# Altium PCB PCB_HV.PcbDoc
Units mm, origin at the board's own origin, x right, y up, seen from the top; angles counter-clockwise.
Board outline 50.11 x 53.87 mm, 2 copper layers (Top Layer, Bottom Layer), stack 1.27 mm thick; 13 components, 10 nets, 38 pads, 0 vias.
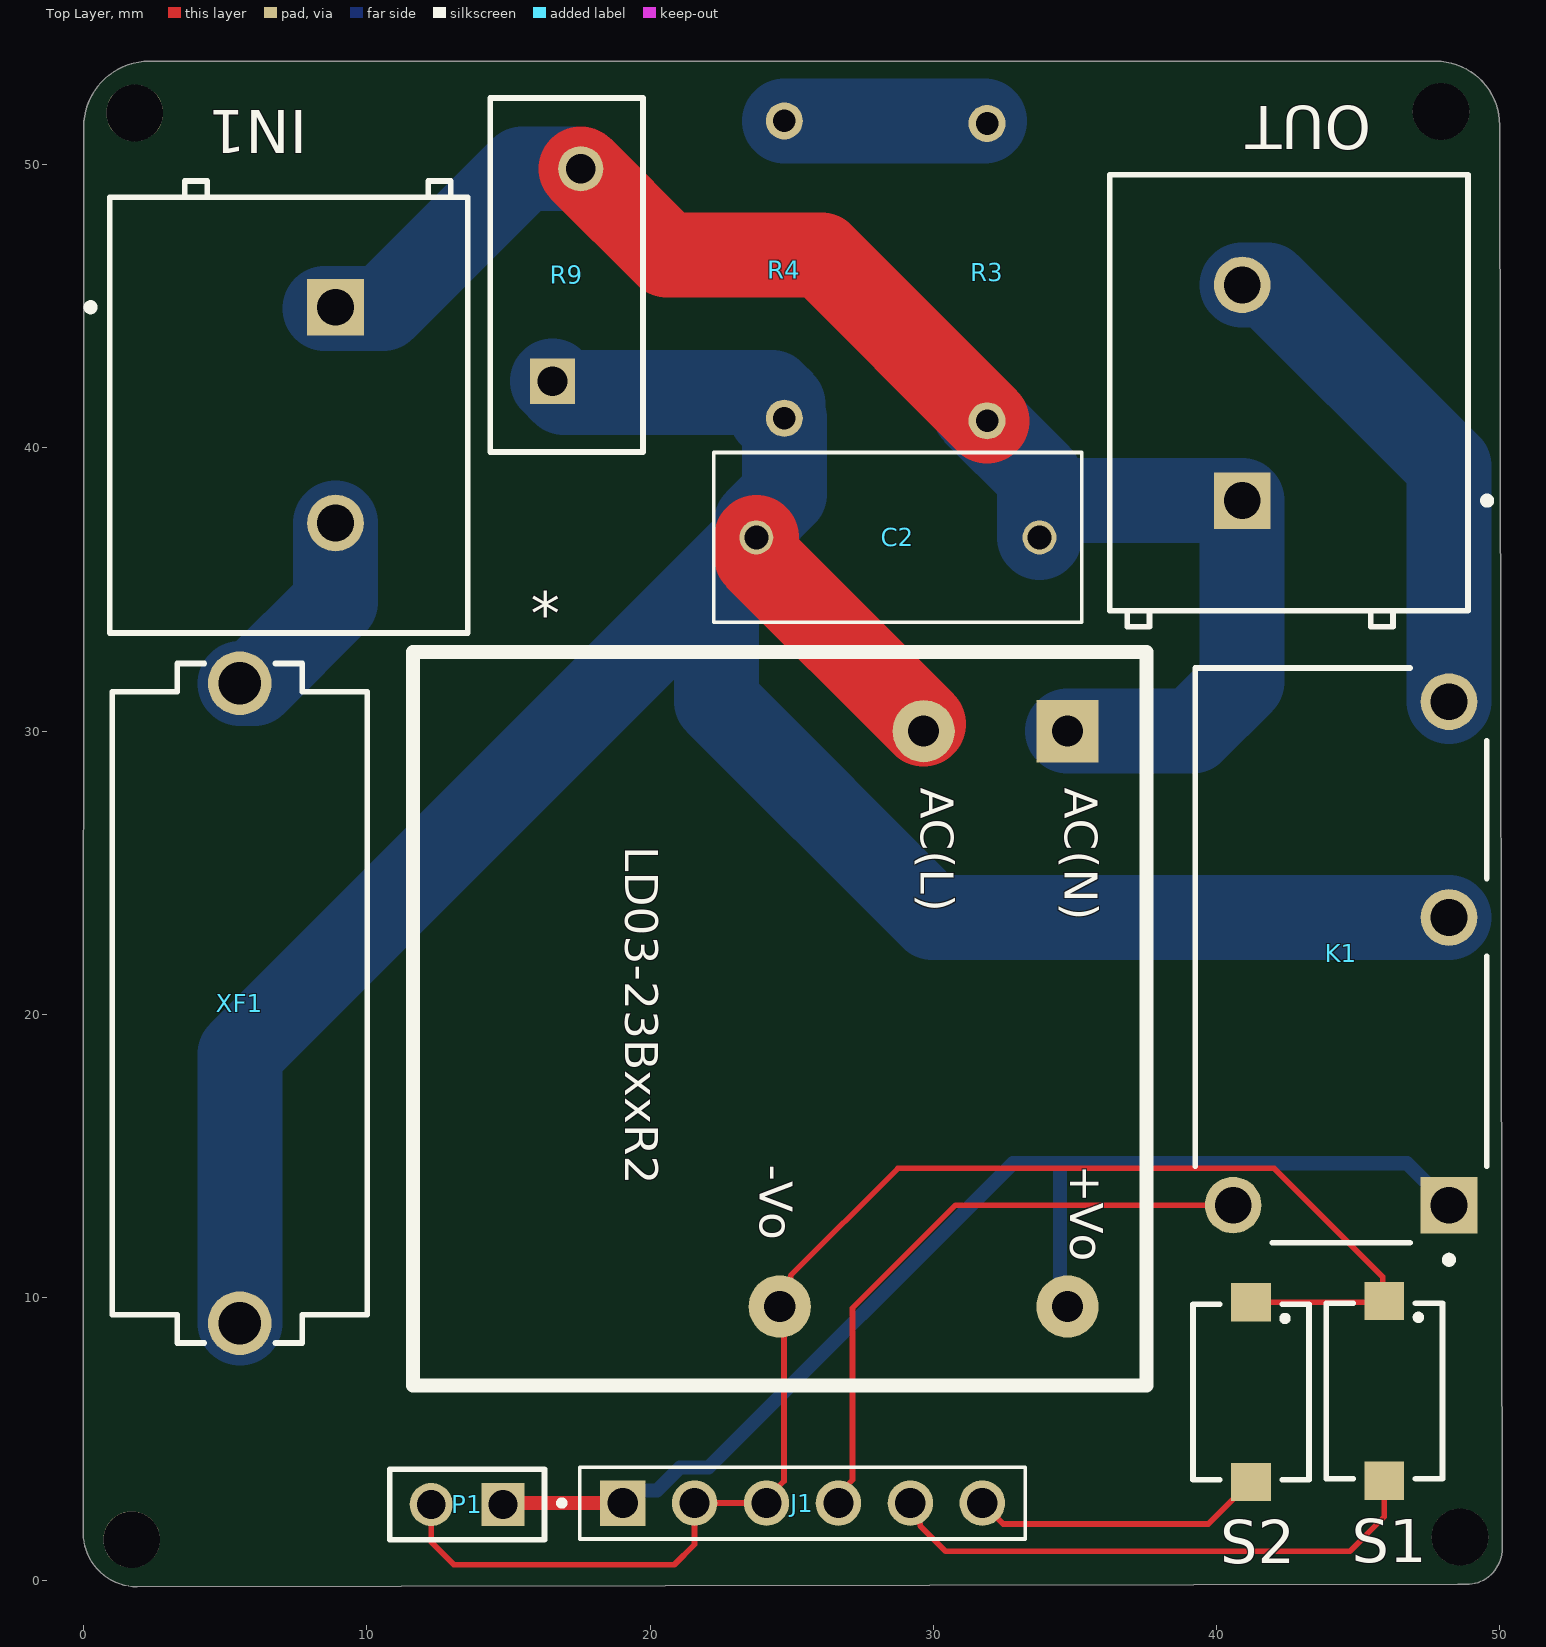
[diagram p0: Top Layer view]
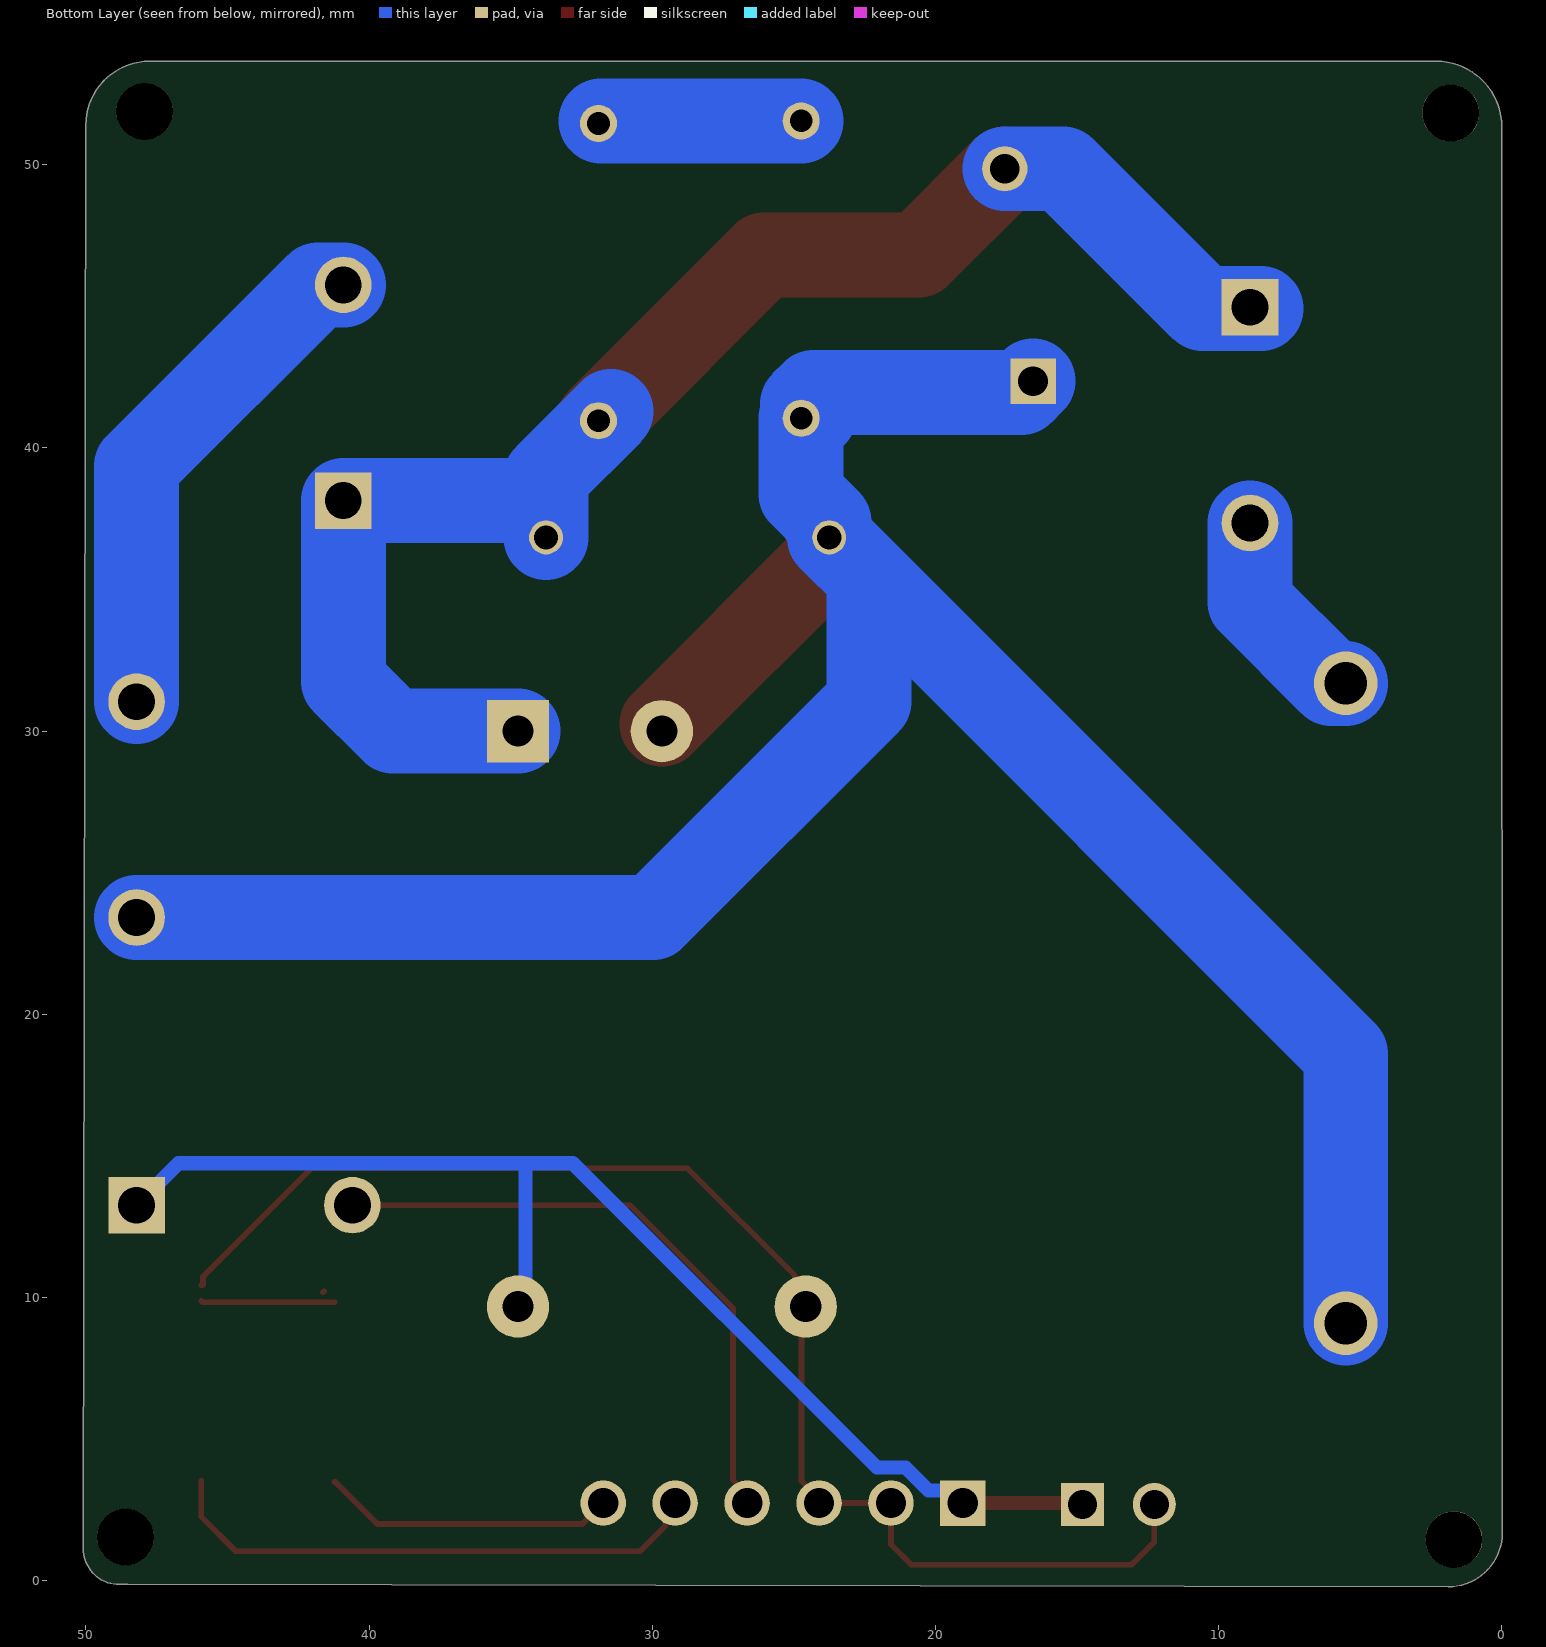
[diagram p1: Bottom Layer view, seen from below]
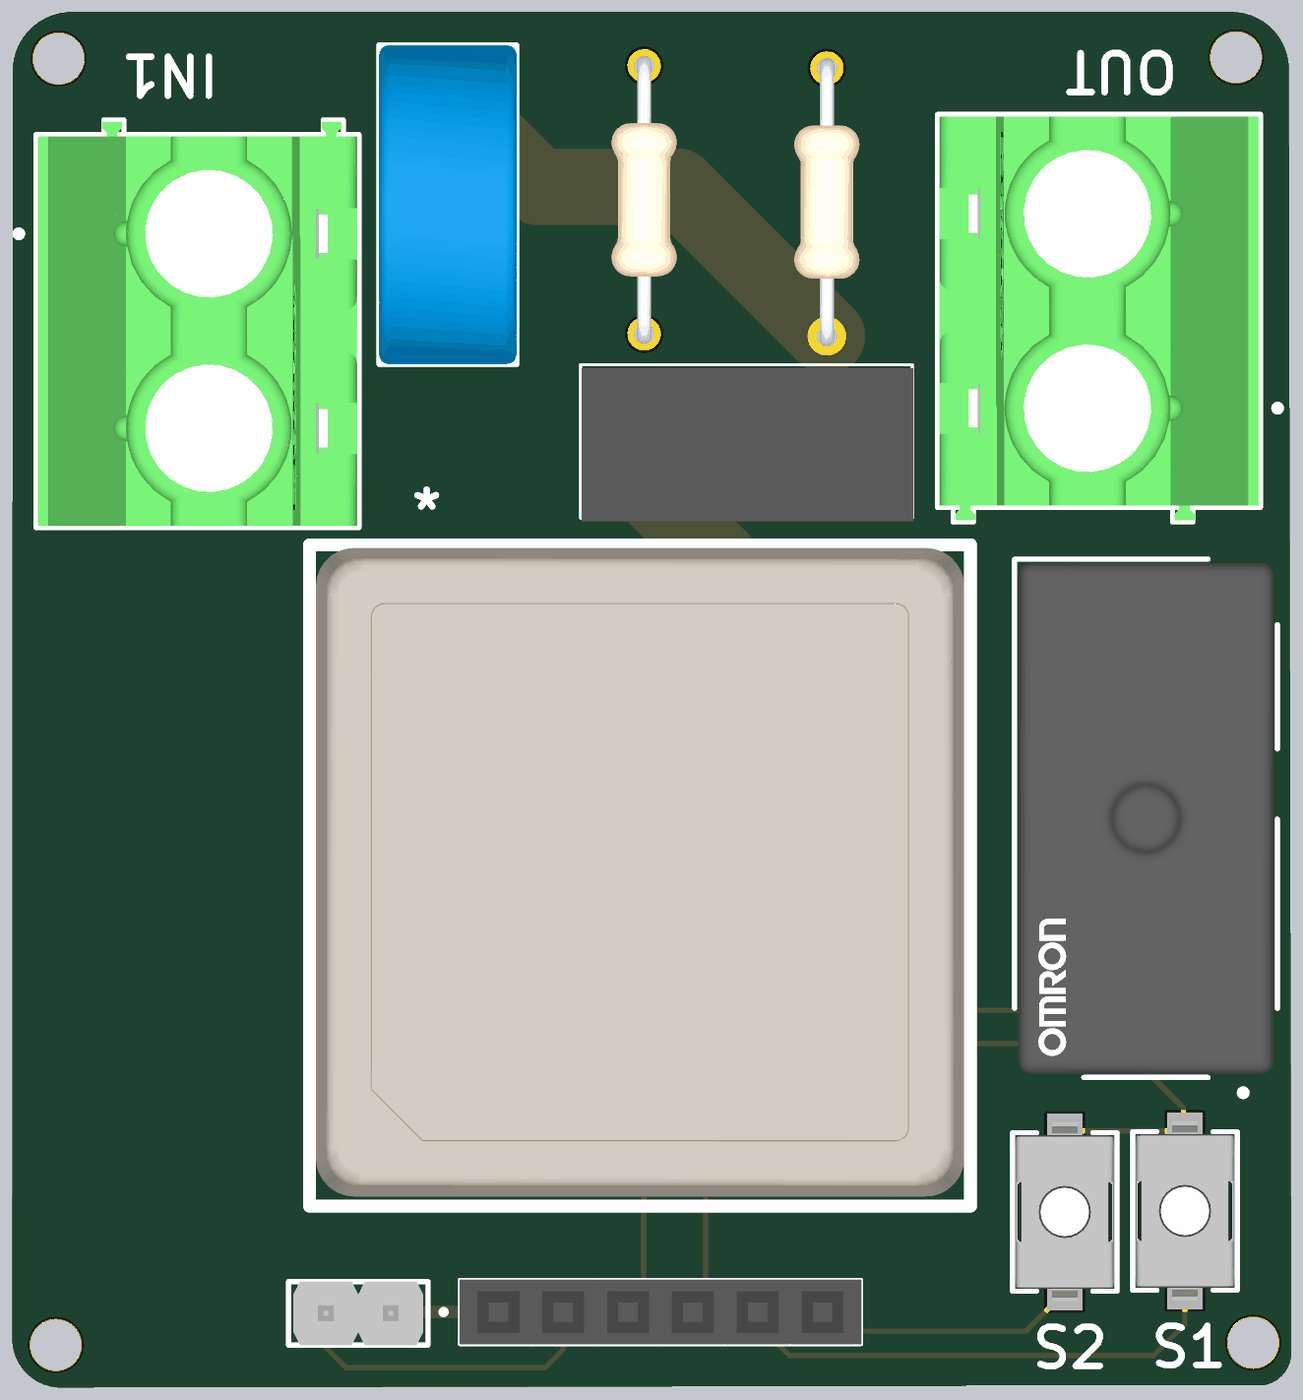
[diagram p2: 3D render of the assembled board from above, using the file's embedded part models]

## Layer stack, top to bottom
Top Solder: solder mask 0.0102, Solder Resist, Dk 3.5
Top Layer: signal copper 0.035
Dielectric 1: dielectric 1.2, FR-4, Dk 4.8
Bottom Layer: signal copper 0.035
Bottom Solder: solder mask 0.0102, Solder Resist, Dk 3.5

## Board outline
1.887,-0.215 cw(c1.887,1.69) -0.018,1.69 0,51.338 cw(c2.318,51.338) 2.318,53.656 47.748,53.656 cw(c47.748,51.405) 49.999,51.405 49.999,51.347 50.093,1.135 cw(c48.823,1.135) 48.823,-0.135 48.516,-0.135

## Design rules (kind name [scope] priority, off if disabled: settings)
Clearance Clearance_HV-HV_exeption [InNet('L_INPUT') vs InNet('N_INPUT')] p1: gap=2.48 ignorepadtopadclearanceinfootprint=FALSE
Clearance Clereance_HV-LV [InNetClass('HV') vs Not InNetClass('HV')] p2: gap=6 ignorepadtopadclearanceinfootprint=FALSE
Clearance Clearance_HV-HV [InNetClass('HV') vs InNetClass('HV')] p3: gap=2.5 ignorepadtopadclearanceinfootprint=FALSE
Clearance [All] p4: gap=0.2 ignorepadtopadclearanceinfootprint=FALSE
PolygonConnect [All] p1: connectstyle=Relief reliefconductorwidth=0.254 reliefentries=4 polygonreliefangle="90 Angle" airgapwidth=0.254
RoutingVias Via_LV [All] p1: holewidth=0.3 width=0.6 viastyle="Through Hole" minholewidth=0.2 minwidth=0.4 maxholewidth=0.3 maxwidth=0.6
SilkToSolderMaskClearance [All] p1: minsilkscreentomaskgap=0.15 clearancetoexposedcopper=TRUE
SolderMaskExpansion [All] p1: expansion=0.102 istentingtop=FALSE
SupplyNets "Schematic Supply Nets_1" [InNet('GND')] p1: voltage=0.000
SupplyNets "Schematic Supply Nets" [InNet('5V')] p2: voltage=0.000
Width Width_HV [InNetClass('HV')] p1: maxlimit=5 minlimit=3 preferedwidth=4
Width Width_LV_POWER [InNet('5V')] p2: maxlimit=0.5 minlimit=0.5 preferedwidth=0.5
Width [All] p3: maxlimit=0.2 minlimit=0.1 preferedwidth=0.15
29 further rules are at their usual default settings.

## Classes and differential pairs
net class HV: L L_INPUT L_OUT N_INPUT NetR3_1
component class POWER: * C2 IN1 J1 K1 OUT P1 R3 R4 S1 S2 XF1

## Components (designator, comment, footprint, x,y, rotation, side; value= is the part's Value field where it differs from the comment)
* "LD03-23BxxR2" LD03-23BxxR2 29.66,19.84 r270 top
C2 "B32921C3104M189" *CAPRR1000W60L1300T600H1200 28.75,36.84 r0 top
IN1 "1868076" FP-1868076-MFG 7.24,41.445 r270 top
J1 "PPTC061LFBN-RC" *SULLINS_PPTC061LFBN-RC 25.38,2.74 r0 top
K1 "G5Q-1A4-DC5" FP-G5Q-1A4-DC5-MFG 44.4,22.08 r90 top
OUT "1868076" FP-1868076-MFG 42.56,41.665 r90 top
P1 "MTLW-102-05-G-S-172" SMTC-MTLW-102-05-X-S-172 14.81,2.69 r180 top
R3 "RES-THT_470k" XTAL_ZTA-6.00MG 31.9,46.21 r270 top
R4 "RES-THT_470k" XTAL_ZTA-6.00MG 24.74,46.3 r90 top
R9 "MOV-10D471K" FP-MOV-10D471K-MFG 17.05,46.11 r90 top value=252pF
S1 "434123025816" 434123025816 45.93,6.7 r270 top
S2 "434123025816" 434123025816 41.22,6.66 r270 top
XF1 "696101000002" 696101000002 1275.51,-1249.61 r270 top

## Footprints (in the part's own frame and the unit in brackets; to place one, negate y for a bottom-side part, rotate by r counter-clockwise, add the part's x,y. Pads: shape width x height; smd on the part's side, far side on the other; paste and mask are expansions set on the pad)
434123025816 [mm]
  rect 1.35x1.4 smd paste+0 mask+0.102: 1(-3.175,0) 2(3.175,0)
  silkscreen extent -3.1,-2.05 3.1,2.05, body extent -3.5,-1.95 3.5,1.95, height 2.5
696101000002 [mm] "FUSEHOLDER BLOCKS - PCB - CLIP COVER - THT"
  round 2.25 hole 1.5: 1(-1281.3,-1270) 2(-1258.7,-1270)
  silkscreen extent -1282,-1274.5 -1258,-1265.5, body extent -1282,-1274.5 -1258,-1265.5, height 13.55
*CAPRR1000W60L1300T600H1200 [mm]
  round 1.2 hole 0.85: 1(-5,0) 2(5,0)
  silkscreen extent -6.5,-3 6.5,3, body extent -6.46,-3.13 6.54,2.87, height 12
*SULLINS_PPTC061LFBN-RC [mm]
  rect 1.605x1.605 hole 1.07: 1(-6.35,0)
  round 1.605 hole 1.07: 2(-3.81,0) 3(-1.27,0) 4(1.27,0) 5(3.81,0) 6(6.35,0)
  silkscreen extent -8.6,-1.27 7.87,1.27, body extent -7.87,-1.27 7.87,1.27, height 8.51
FP-1868076-MFG [mm]
  rect 2x2 hole 1.3 paste-2539.97 mask+0: 1(-3.525,1.65)
  round 2 hole 1.3 paste-2539.97 mask+0: 2(4.095,1.65)
  silkscreen extent -7.98,-7.12 7.98,6.32, body extent -8.08,-6.43 8.08,6.43, height 0.25
FP-G5Q-1A4-DC5-MFG [mm]
  rect 2x2 hole 1.3 paste-2539.97 mask+0: 1(-8.82,-3.81)
  round 2 hole 1.3 paste-2539.97 mask+0: 2(1.34,-3.81) 3(8.96,-3.81) 5(-8.82,3.81)
  silkscreen extent -10.87,-5.15 10.15,5.15, body extent -10.25,-5.25 10.25,5.25, height 0.25
FP-MOV-10D471K-MFG [mm]
  rect 1.6x1.6 hole 1.05 paste-2539.97 mask+0: 1(-3.75,0.5)
  round 1.6 hole 1.05 paste-2539.97 mask+0: 2(3.75,-0.5)
  silkscreen extent -6.25,-2.7 6.25,2.7, body extent -6.35,-2.8 6.35,2.8, height 0.25
LD03-23BxxR2 [mm]
  rect 2.2x2.2 hole 1.1: 1(-10.16,5.08)
  round 2.2 hole 1.1: 2(-10.16,0) 4(10.16,-5.08) 5(10.16,5.08)
  silkscreen extent -12.95,-18.03 12.95,7.87, body extent -12.83,-17.78 12.57,7.62, height 17.7
SMTC-MTLW-102-05-X-S-172 [mm] "Terminal Assembly, 1x2 Pins, Vertical, 2.54mm Pitch, Male"
  rect 1.52x1.52 hole 1.02: 1(0,0)
  round 1.52 hole 1.02: 2(2.54,0)
  silkscreen extent -1.46,-1.24 4,1.24, body extent -1.27,-1.24 3.81,1.24, height 5.89
XTAL_ZTA-6.00MG [mm]
  round 1.308 hole 0.8: 1(-5.25,0) 2(5.25,0)
  body extent -5.63,-1.3 5.63,1.3, height 2.6

## Part data
C2: "Cap Film Suppression X2 0.1uF 305VAC PP 20% (13 X 6 X 12mm) Radial Plastic Rectangular Can 10mm 105C T/R", Package=Package, Availability="In Stock", Check_prices=https://www.snapeda.com/parts/B32921C3104M189/EPCOS/view-part/?ref=eda, MF=EPCOS, MP=B32921C3104M189, Price=None, SnapEDA_Link=https://www.snapeda.com/parts/B32921C3104M189/EPCOS/view-part/?ref=snap
IN1 OUT: library part CMP-00298-00856132-1, "1868076 Conn Terminal Block 2 POS 7.62mm Solder ST Thru-Hole 32A Cardboard", Color=Green, Current=10A, Current Rating=32A, Flammability Rating="UL94 V-0", Voltage=300V, Voltage Rating=500V, Approvals="CSA, UL, cULus", Contact Material=Tin, Depth=12.5mm, Height=19.05mm, Housing Color=Green, Housing Material=Polyamide, Lead Free="Lead Free", Length=22.86mm, Mount="Through Hole", NexarPartId=856132, Number of Circuits=2, Number of Contacts=2, Number of Levels=1, Number of Pins=2, Number of Poles=2, Number of Positions=2, Number of Positions Per Level=2, Number of Rows=1, Orientation=Straight, Pitch=7.62mm, Radiation Hardening=No, RoHS=Compliant, Stripping Length=8mm, Termination=Solder, Weight=6.000006g, Width=26.6mm, Wire Gauge (Max)=30AWG, Wire Gauge (Min)=10AWG
J1: "6 Position Total Single Row 2.54 mm Pitch Straight Female Header", Package=None, Availability="In Stock", Check_prices=https://www.snapeda.com/parts/PPTC061LFBNRC/Sullins/view-part/?ref=eda, MF="Sullins Connector Solutions", MP=PPTC061LFBNRC, Price=None, SnapEDA_Link=https://www.snapeda.com/parts/PPTC061LFBNRC/Sullins/view-part/?ref=snap, System=Connector
K1: library part CMP-08822-000148-1, "RELAY GEN PURPOSE SPST 10A 5V", Coil Current=40mA, Coil Power=200mW, Coil Resistance=125R, Coil Voltage (DC)=5V, Contact Current Rating=10A, Max Operating Temperature=105°C, Max Voltage Rating (AC)=277V, Max Voltage Rating (DC)=30V, Min Operating Temperature=-40°C, Package Quantity=400, Power Consumption=2mW, Approvals=UL, Coil Type=Non-Latching, Contact Material=Silver, Current Rating=10A, Depth=10.3mm, Length=20.3mm, Max Current Rating=10A, Mount="Through Hole", Number of Pins=4, Operate Time=10ms, Packaging=Bulk, Radiation Hardening=No, Relay Type="General Purpose", Release Time=5ms, Series=G5Q, Termination="PC Pin", Throw Configuration=SPST, Voltage Rating (AC)=277V, Weight=6.5g
P1: library part CMP-1024-00064-1, "Low Profile .025\" SQ Post Header, Through-hole, Vertical, -55 to 125 degC, 2.54 mm Pitch, 2-Pin, Male, RoHS", Manufacturer=Samtec, Temperature Range="-55 to 125 degC", ComponentLink1Description="Manufacturer URL", ComponentLink1URL=http://www.samtec.com, ComponentLink2Description=Datasheet, ComponentLink2URL=http://www.samtec.com/documents/webfiles/pdf/MTLW_TH.PDF, ComponentLink3Description="Package Specification", ComponentLink3URL=http://www.samtec.com/documents/webfiles/cpdf/MTLW-1XX-XX-XX-X-XXX-XX-XX-MKT1.pdf, DatasheetVersion=F-214, Mounting Technology=Through-hole, Orientation=Vertical, PackageDescription="Low Profile Terminal Assembly", PackageReference=MTLW-102-05-X-S-172, PackageVersion="T, 6/1991", PartNumber=MTLW-102-05-G-S-172, Pitch="2.54 mm", RoHS=True
R3 R4: "Through Hole Resistor", Case/Package=Axial, Max Operating Temperature=175°C, Max Power Dissipation=50mW, Min Operating Temperature=-65°C, Temperature Coefficient=50ppm/°C, Tolerance=1%, Voltage Rating=200V, Composition="Metal Film", Contact Plating="Lead, Tin", Diameter=1.65mm, Features="Flame Retardant Coating, Military", Height=2.03mm, Lead Diameter=410µm, Lead Free="Contains Lead", Length=3.81mm, Military Standard=MIL-R-10509, Mount="Through Hole", NexarPartId=43762971, Number of Terminations=2, Packaging=Bulk, Power Rating=50mW, Radiation Hardening=No, RoHS=Non-Compliant, Termination=Axial, Width=1.651mm
R9: library part CMP-07402-000002-1, "VARISTOR 470V 2.5KA DISC 10MM", Capacitance=252pF, Clamping Current=25A, Clamping Voltage=775V, Manufacturer="Bourns Inc.", Package=RADIAL, Temperature="-40°C to +105°C", Temperature Range High=+105°C, Temperature Range Low=-40°C, Varistor Voltage=470V, Voltage Rating Ac=300V, Voltage Rating Dc=385V, Voltage Tolerance=10%, Automotive=No, Category=Res, ComponentLink2Description=Datasheet, ComponentLink2URL=https://www.bourns.com/docs/product-datasheets/mov10d.pdf?sfvrsn=b57e8a7f_26, Device Class L1="Circuit Protection", Device Class L2=Varistors, Device Class L3=unset, Digikey Description="VARISTOR 470V 2.5KA DISC 10MM", Height=15.5mm, Lead Free=Yes, Manufacturer Part Number=MOV-10D471K, Mouser Description="Var MOV 300VAC/385VDC 2500A 470V Thru-Hole Radial Bulk", Octopart=https://octopart.com/mov-10d471k-bourns-19184782, RoHS=TRUE
S1 S2: "Tactile Switch SPST-NO Top Actuated Surface Mount", Package=None, Check_prices=https://www.snapeda.com/parts/434123025816/W%25C3%25BCrth+Elektronik+Midcom/view-part/?ref=eda, MF="WÃ¼rth Elektronik", MP=434123025816, SnapEDA_Link=https://www.snapeda.com/parts/434123025816/W%25C3%25BCrth+Elektronik+Midcom/view-part/?ref=snap
XF1: library part CMP-1502-00233-4, "WR-FSH Fuse Holder Blocks Fuse Holder Blocks Clip Cover for PCB", Fuse Current=10A, Max Operating Temperature=120°C, Min Operating Temperature=-30°C, Voltage Rating (AC)=250V, Height=13.6mm, Mount="Through Hole", Packaging=Box, REACH SVHC=Unknown, RoHS=Compliant

## Free pads (board coordinates)
  round 2 hole 2: 1(1.69,1.45) 1(1.8,51.83) 1(47.93,51.88) 1(48.6,1.54)

## Nets (pads, with @x,y where several pads share a name; then routed paths per layer and width w, separated by ;. In a path a pad name is that pad's centre, name@x,y a point inside that pad or via, vN(x,y) a via of type N, cw(c..) or ccw(c..) an arc to the next point about the centre after c; other vN are vias at no path point)
5V: *.5 J1.1 K1.1 P1.1 | length 44.2
  Top Layer w0.5: P1.1 14.86,2.74 J1.1
  Bottom Layer w0.5: J1.1 19.478,3.188 20.247,3.188 21.051,3.992 22.063,3.992 32.81,14.74 34.48,14.74 ; *.5 34.48,9.94 34.48,14.74 ; K1.1 46.73,14.74 34.48,14.74
BOOT: J1.5 S1.2 | length 19.5
  Top Layer w0.2: J1.5 29.19,2.36 29.54,2.01 29.54,1.93 30.43,1.04 44.71,1.04 45.93,2.26 S1.2
EN: J1.6 S2.2 | length 10.4
  Top Layer w0.2: J1.6 32.47,2 39.71,2 41.195,3.485 S2.2
GND: *.4 J1.2 J1.3 P1.2 S1.1 S2.1 | length 53
  Top Layer w0.2: P1.2 12.27,1.36 13.07,0.56 20.85,0.56 21.57,1.28 J1.2 J1.3 24.11,2.893 24.73,3.513 24.73,9.53 *.4 24.963,10.063 24.963,10.773 28.75,14.56 42.04,14.56 45.867,10.733 45.867,10.45 45.882,10.435 S1.1@45.93,10.435 ; S2.1 45.89,9.835 S1.1 ; S2.1@41.59,10.225 S2.1@41.63,10.185
L: IN1.2 XF1.1 | length 7.4
  Bottom Layer w3: XF1.1 6.02,31.69 8.89,34.56 IN1.2
L_INPUT: *.2 C2.1 K1.2 R4.1 R9.1 XF1.2 | length 91.5
  Top Layer w3: C2.1 23.75,36.16 *.2@29.66,30.25
  Bottom Layer w3: XF1.2 5.51,18.6 22.35,35.44 ; R9.1 16.954,41.956 24.304,41.956 24.7,41.56 R4.1@24.28,41.14 ; R4.1 24.74,38.37 23.75,37.38 C2.1 22.35,35.44 ; K1.2 29.97,23.42 22.35,31.04 22.35,35.44
L_OUT: K1.3 OUT.2 | length 18.3
  Bottom Layer w3: OUT.2 41.81,45.76 48.21,39.36 K1.3
N_INPUT: *.1 C2.2 IN1.1 OUT.1 R3.2 R9.2 | length 53.7
  Top Layer w3: R9.2 20.6,46.81 26.05,46.81 R3.2
  Bottom Layer w3: IN1.1@8.51,44.92 10.56,44.92 15.5,49.86 R9.2 ; R3.2@31.45,41.28 33.75,38.98 C2.2 ; *.1 39.153,30 40.91,31.757 OUT.1 35.05,38.14
NetR3_1: R3.1 R4.2 | length 7.1
  Bottom Layer w3: R4.2 R3.1@31.81,51.55
Relais: J1.4 K1.5 | length 22
  Top Layer w0.2: J1.4 26.65,3.06 27.15,3.56 27.15,9.623 30.787,13.26 K1.5

## Silkscreen, mask and mechanical layers (free items; w line width, h text height)
Mechanical 1:
  lines w0.254: 49.999,51.347 50.093,1.135 cw(c48.823,1.135) 48.823,-0.135 48.516,-0.135 1.887,-0.215 cw(c1.887,1.69) -0.018,1.69 0,51.338 cw(c2.318,51.338) 2.318,53.656 47.748,53.656 cw(c47.748,51.405) 49.999,51.405

## Text inside footprints (layer, text, board x,y; h text height)
*: Top Overlay "-Vo" at 23.483,14.68 h2 r270; Top Overlay "+Vo" at 34.441,14.68 h2 r270; Top Overlay "AC(L)" at 29.174,28 h2 r270; Top Overlay "AC(N)" at 34.254,28 h2 r270